# EAGLE board watts_meter (EAGLE 9.6.2)
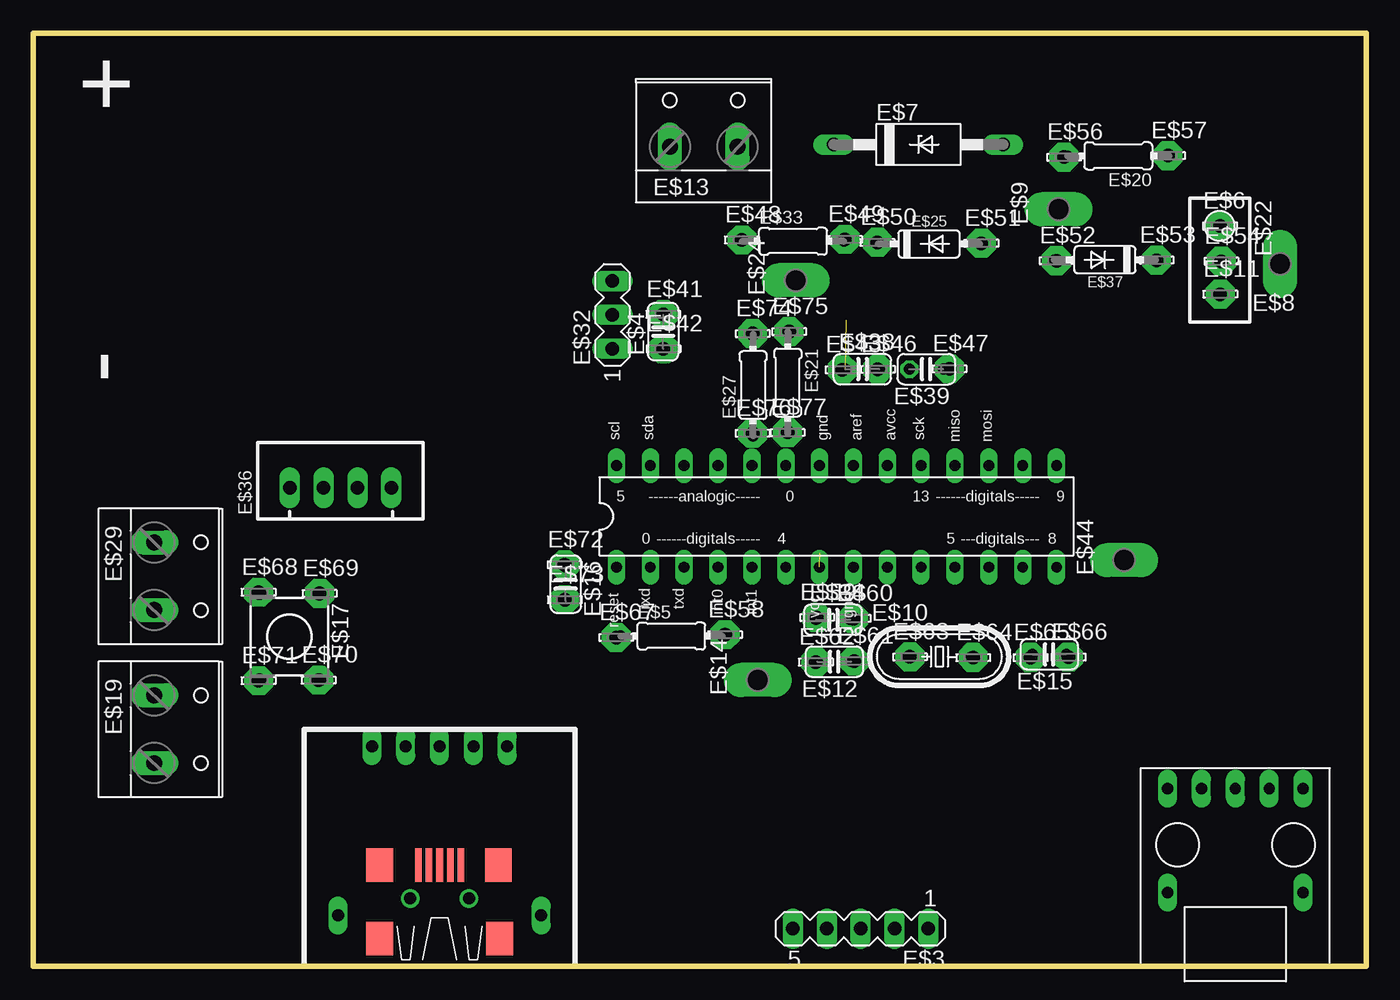
[diagram p0: board, top side]
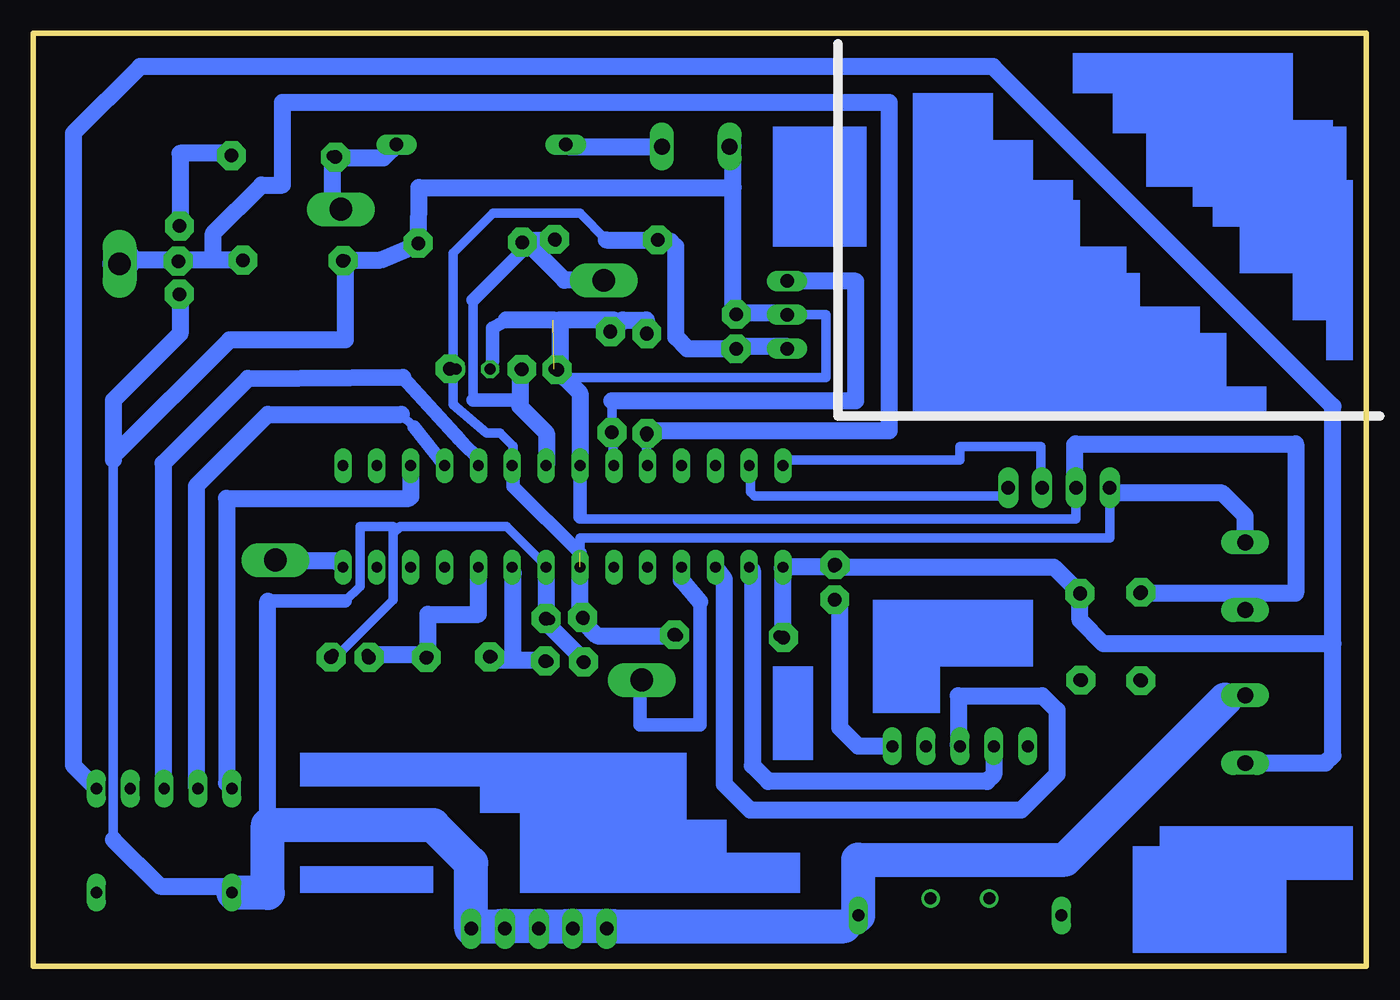
[diagram p1: board, bottom side, seen from below]

Size 100 x 70 mm. Coordinates in mm from the lower left corner, seen from the top.
Outline: 0,0 0,70 100,70 100,0 0,0
Copper layers (1*16): Top 0.035mm / dielectric 1.5mm / Bottom 0.035mm
Design rules "default *": minimum track width 0.7mm, minimum drill 24mil, track to track 8mil, track to pad 8mil, pad to pad 8mil, via to via 8mil, smd to smd 8mil, copper to edge 40mil, drill to drill 8mil, minimum pad ring 10mil, minimum via ring 8mil, stop-mask expansion 4mil, vias tented up to drill 0mil, thermal gap 10mil

## Footprints (pad centres in the part's own frame; a part is rotated, then mirrored left to right if it is on the bottom)
ATMEGA328 = drill 0.813 long: 1 -16.51,-3.81; 2 -13.97,-3.81; 3 -11.43,-3.81; 4 -8.89,-3.81; 5 -6.35,-3.81; 6 -3.81,-3.81; 7 -1.27,-3.81; 8 1.27,-3.81; 9 3.81,-3.81; 10 6.35,-3.81; 11 8.89,-3.81; 12 11.43,-3.81; 13 13.97,-3.81; 14 16.51,-3.81; 15 16.51,3.81; 16 13.97,3.81; 17 11.43,3.81; 18 8.89,3.81; 19 6.35,3.81; 20 3.81,3.81; 21 1.27,3.81; 22 -1.27,3.81; 23 -3.81,3.81; 24 -6.35,3.81; 25 -8.89,3.81; 26 -11.43,3.81; 27 -13.97,3.81; 28 -16.51,3.81
USBMINIB = smd 2.5 x 0.5: D+ -3.85,0; D- -3.85,0.8; GND -3.85,-1.6; ID -3.85,-0.8; VBUS -3.85,1.6 | drill 0.9 long: P$1 5.08,0; P$2 5.08,2.54; P$3 5.08,5.08; P$4 5.08,-2.54; P$5 5.08,-5.08; P$6 -7.62,7.62; P$7 -7.62,-7.62 | drill 0.9: P$8 -6.35,2.2; P$9 -6.35,-2.2 | smd 2.5 x 2: P$10 -9.35,-4.5; P$11 -9.35,4.5; P$12 -3.85,-4.4; P$13 -3.85,4.5
MA05-1 = drill 1.016 long: 1 -5.08,0; 2 -2.54,0; 3 0,0; 4 2.54,0; 5 5.08,0
C025-024X044 = drill 0.813 octagon: 1 -1.27,0; 2 1.27,0
0204/7 = drill 0.813 octagon: 1 -3.81,0; 2 3.81,0
LSP10 = drill 1.016 pad 2.159 octagon: MP 0,0
DIODE_F126Z12 = drill 1.016 long: A 6.35,0; C -6.35,0
P1-17Y = drill 1.702 pad 2.121 long: TP 0,0
HC49/S = drill 0.813: 1 -2.413,0; 2 2.413,0
W237-132 = drill 1.194 long: 1 -2.54,-0.635; 2 2.54,-0.635
TL1105 = drill 1 pad 1.676: 1 -2.25,3.25; 2 2.25,3.25; 3 -2.25,-3.25; 4 2.25,-3.25
RTRIM3296W = drill 0.61: 1 0,-2.54; 2 0,0; 3 0,2.54
DO35-7 = drill 0.813: A 3.81,0; C -3.81,0
MA03-1 = drill 1.016 long: 1 -2.54,0; 2 0,0; 3 2.54,0
JST-XH-04-PACKAGE-LONG-PAD = drill 1.016 long: 1 -3.81,0; 2 -1.27,0; 3 1.27,0; 4 3.81,0
USB-MICRO-PCB = drill 0.85 pad 1.422 long: P$1 -5.08,6.35; P$2 -2.54,6.35; P$3 0,6.35; P$4 2.54,6.35; P$5 5.08,6.35; P$6 -5.08,-1.47; P$7 5.08,-1.47

## Placement (x,y rotation side)
E$1  [ATMEGA328]  60.26,33.75 0 top
E$2  [USBMINIB]  30.48,11.43 90 top
E$3  ground-group  [MA05-1]  62.07,2.81 180 top
E$4  0.1uF  [C025-024X044]  47.26,47.61 90 top
E$5  10k  [0204/7]  47.87,24.77 0 top
E$6  [LSP10]  89.03,55.54 0 top
E$7  zener 60v  [DIODE_F126Z12]  66.4,61.65 0 top
E$8  123  [P1-17Y]  93.53,52.69 180 top
E$9  123  [P1-17Y]  76.93,56.8 90 top
E$10  16Mhz  [HC49/S]  67.97,23.23 0 top
E$11  [LSP10]  89.05,50.43 0 top
E$12  22p  [C025-024X044]  60.1,22.84 180 top
E$13  72V  [W237-132]  50.3,62.13 0 top
E$14  tx_to_multiplx  [P1-17Y]  54.35,21.47 90 top
E$15  22p  [C025-024X044]  76.22,23.41 180 top
E$16  [C025-024X044]  39.94,28.67 270 top
E$17  [TL1105]  19.22,24.73 180 top
E$19  reset  [W237-132]  9.71,17.78 270 top
E$20  2.2k  [0204/7]  81.4,60.8 180 top
E$21  10k  [0204/7]  56.6,43.8 270 top
E$22  2k - 202  [RTRIM3296W]  89,53 180 top
E$24  123  [P1-17Y]  57.19,51.47 90 top
E$25  5v1 zener  [DO35-7]  67.2,54.2 0 top
E$27  10k  [0204/7]  54,43.6 90 top
E$29  5V  [W237-132]  9.71,29.26 270 top
E$32  [MA03-1]  43.45,48.88 90 top
E$33  220  [0204/7]  57,54.4 0 top
E$34  1uF  [C025-024X044]  60,26 0 top
E$36  display  [JST-XH-04-PACKAGE-LONG-PAD]  23.04,35.91 0 top
E$37  5v1 zener  [DO35-7]  80.4,53 180 top
E$38  0.1uF  [C025-024X044]  62.2,44.8 0 top
E$39  1uF  [C025-024X044]  67,44.8 180 top
E$41  [LSP10]  47.26,48.91 0 top
E$42  [LSP10]  47.28,46.33 0 top
E$43  [LSP10]  60.7,44.76 0 top
E$44  tx_to_multiplx  [P1-17Y]  81.85,30.47 90 top
E$46  [LSP10]  63.36,44.79 0 top
E$47  [LSP10]  68.73,44.83 0 top
E$48  [LSP10]  53.16,54.51 0 top
E$49  [LSP10]  60.89,54.54 0 top
E$50  [LSP10]  63.32,54.32 0 top
E$51  [LSP10]  71.13,54.25 0 top
E$52  [LSP10]  76.77,52.94 0 top
E$53  [LSP10]  84.27,52.98 0 top
E$54  [LSP10]  89.13,52.9 0 top
E$56  [LSP10]  77.33,60.71 0 top
E$57  [LSP10]  85.13,60.82 0 top
E$58  [LSP10]  51.89,24.87 0 top
E$59  [LSP10]  58.79,26.17 0 top
E$60  [LSP10]  61.54,26.09 0 top
E$61  [LSP10]  61.59,22.9 0 top
E$62  [LSP10]  58.71,22.82 0 top
E$63  [LSP10]  65.76,23.21 0 top
E$64  [LSP10]  70.51,23.16 0 top
E$65  [LSP10]  74.81,23.16 0 top
E$66  [LSP10]  77.66,23.18 0 top
E$67  [LSP10]  43.73,24.66 0 top
E$68  [LSP10]  16.9,28.05 0 top
E$69  [LSP10]  21.47,27.96 0 top
E$70  [LSP10]  21.4,21.47 0 top
E$71  [LSP10]  16.9,21.42 0 top
E$72  [LSP10]  39.86,30.12 0 top
E$73  [LSP10]  39.88,27.5 0 top
E$74  [LSP10]  53.97,47.47 0 top
E$75  [LSP10]  56.7,47.62 0 top
E$76  [LSP10]  53.96,39.98 0 top
E$77  [LSP10]  56.58,40.05 0 top
PROGRAM  Program  [USB-MICRO-PCB]  90.19,6.99 0 top

## Library data of the parts
E$1 E$2 PROGRAM = LSGPackages
E$3 E$32 = con-lstb
E$4 E$12 E$15 E$16 E$22 E$34 E$38 E$39 = rcl
E$5 E$7 E$20 E$21 E$27 E$33 = eagle-ltspice
E$6 E$11 E$41-E$43 E$46-E$54 E$56-E$77 = solpad
E$8 = testpad; VOLTAGE_DIVIDER: voltage-div
E$9 = testpad; VOLTAGE_ZENER: voltage-zen60
E$10 = crystal
E$13 E$19 E$29 = con-wago-508
E$14 = testpad; INT0: int_in_attiny
E$17 = switch
E$24 = testpad; VOLTAGE_DIVIDER: aref
E$25 = diodes-zener; DIODEZENER: 4v7-zener
E$36 = Rembrandt Electronics - JST XH Connectors v1-0; A4: a4; A5: a5; GROUND: gnd; VCC: vcc
E$37 = diodes-zener; DIODEZENER: 5v1-zener
E$44 = testpad; TX_TO_MULTIPLX: tx_to_multiplx

## Nets
5V: E$1.7 E$1.20 E$4.1 E$5.2 E$29.1 E$32.1 E$33.1 E$34.1 E$36.1 E$39.1
GROUND: E$1.8 E$1.22 E$2.P$7 E$3.1 E$3.2 E$3.3 E$3.4 E$3.5 E$4.2 E$12.2 E$13.1 E$15.1 E$17.4 E$19.1 E$21.1 E$22.3 E$25.A E$27.2 E$29.2 E$32.2 E$34.2 E$36.2 E$37.A E$38.1 E$39.2 PROGRAM.P$6
S$2: E$1.9 E$10.1 E$12.1
S$3: E$1.10 E$10.2 E$15.2
S$4: E$1.13
S$5: E$2.P$5 E$16.2
S$7: E$1.1 E$5.1 E$16.1 E$17.3 E$19.2 PROGRAM.P$5
S$8: E$7.A E$9.TP E$20.2
S$9: E$7.C E$13.2
S$10: E$1.17 PROGRAM.P$1
S$11: E$1.18 PROGRAM.P$2
S$12: E$1.19 PROGRAM.P$3
S$13: E$1.3 E$2.P$1
S$14: E$1.2 E$2.P$2
S$15: E$1.28 E$36.3
S$16: E$1.27 E$36.4
S$17: E$20.1 E$22.1
S$19: E$1.14 E$44.TP
S$20: E$1.4 E$14.TP
S$21: E$1.23 E$21.2 E$32.3
S$23: E$1.24 E$8.TP E$22.2 E$27.1 E$37.C
S$24: E$1.21 E$24.TP E$25.C E$33.2 E$38.2

## Tracks (layer width: path | path; a pad name or v marks a point on that pad's centre or on a via)
5V  (1 unrouted)
  Bottom 0.7: 47,46.5 E$4.1 | 43.5,46.5 E$32.1 | 52.19,54.4 51.8,54.01 | 19,35.5 E$36.1 19.23,32.12 59,32.12 E$1.7 59,29.5 | 58.73,25.83 E$34.1 59,26 | 51.72,24.8 E$5.2 | 64,37.5 E$1.20 64,37.63 64.02,37.68 64.02,39.02 65,40 66,40 68.5,42.16 68.5,44.57 E$39.1 68.5,44.8 68.5,53.5 65.5,56.5 59,56.5 57,54.5 | 53.5,54.5 E$33.1
  Bottom 1.016: 64,37.5 64,36 59,31
  Bottom 1.27: 43.5,46.5 47,46.5 | 51.8,54.01 51.8,47.2 50.94,46.34 E$4.1 | 52.19,54.4 E$33.1 | 19,35.5 10.8,35.5 9.08,33.78 E$29.1 | 51.72,24.8 57.7,24.8 58.73,25.83 | 59,26 59,29.5 | 57,54.5 53.5,54.5
GROUND  (1 unrouted)
  Bottom 0.7: 61.27,25.53 E$34.2 61.5,26 | 59,23 E$12.2 | 61.5,29.5 E$1.8 61.5,30 64.5,33 72.5,33 73,32.5 | 73,32.5 73,33 75.5,33 75.5,28.5 76.6,27.4 | 73,32.5 73,27.5 77,23.5 E$15.1 | 60,3 E$3.4 | 62,3 E$3.3 62.5,3 | 64.5,3 E$3.2 | 85,5.5 PROGRAM.P$6 85.5,6 | 67,3 E$3.1 | 39.15,3 E$2.P$7 | 56.5,3 E$3.5 57,3 | 10.6,20 9.5,20 E$19.1 | 47,49 E$4.2 47.5,49 | 43.5,49 E$32.2 40.52,48.88 40.52,44.16 60.16,44.16 | 47.5,61.5 E$13.1 | E$39.2 65.54,45.4 | 59,38 E$1.22 | 58.99,33.69 58.84,33.55 21.77,33.55 E$36.2 21.86,35.94 | 21.86,39.14 21.8,39.2 | 94,38.5 94,38 94,9.5
  Bottom 1.016: 82.4,27.4 76.6,27.4 | 65.54,45.4 65.54,47.87 64.5,48.5 | E$1.22 58.99,33.69
  Bottom 1.27: 59,23 59,23.26 61.27,25.53 | 61.5,26 61.5,29.5 | 82.4,10.58 82.4,27.4 | 43.5,49 47,49 | 47.5,49 47.5,58.44 | 47.5,58.44 47.5,61.5 | 47.5,58.44 71.07,58.44 71.08,54.27 E$25.A 73.95,53 E$37.A 76.59,47 85.28,47 94,38.28 | 61,48.5 64.5,48.5 | E$27.2 54,48.5 55.79,48.5 E$21.1 56.6,48.4 56.5,48.5 60.5,48.5 60.5,45.23 E$38.1 60.5,44.5 60.16,44.16 59,43 59,38 | E$17.4 16.95,28 9.36,28 9.08,27.72 E$29.2 9.08,28 5.3,28 5.3,39.2 21.8,39.2 | 21.86,35.94 21.86,39.14 | 85.5,6 90.5,6 94,9.5 | 94,38.28 94,38 | 94,38.28 94,42.46 89,47.46 E$22.3
  Bottom 2.54: 62,3 60,3 | 62.5,3 64.5,3 | 85,5.5 82.4,5.5 82.4,10.58 70,10.58 67.15,7.73 E$3.1 | 67,3 65,3 E$3.2 | 56.5,3 39.15,3 | 10.6,20 22.6,8 38.1,8 E$2.P$7 | 57,3 59.5,3 E$3.4
S$2
  Bottom 0.7: 61.5,23 E$12.1 | 65.5,23 E$10.1 | 64,29.5 E$1.9
  Bottom 1.27: 65.5,23 64,23 | 64,23 61.5,23 | 64,23 64,29.5
S$3
  Bottom 0.7: 70.4,23.5 70.5,23.5 70.46,23.4 E$10.2
  Bottom 1.27: E$15.2 74.95,23.4 70.46,23.4 | 70.4,23.5 70.39,26.4 66.61,26.4 E$1.10
S$4
  Bottom 0.7: 74.24,29.92 E$1.13
S$5
  Bottom 1.27: E$2.P$5 38.11,16.51 39.5,17.9 39.5,27 E$16.2
S$7
  Bottom 0.7: 40,30 E$16.1 | 43.5,30 E$1.1 43.8,29.85 | 21.5,28 E$17.3
  Bottom 1.27: 43.5,30 40,30 | 43.8,29.85 43.8,25.04 E$5.1 | E$16.1 23.44,29.94 21.5,28 | PROGRAM.P$5 97,15.07 97,62.5 92,67.5 28,67.5 2.5,42 2.5,24.2 | 2.5,24.2 2.5,15.8 3.06,15.24 E$19.2 | E$17.3 21.47,25.97 19.7,24.2 2.5,24.2
S$8
  Bottom 1.27: E$7.A 73.75,60.65 77.44,60.65 E$20.2 77.59,57.46 E$9.TP
S$9
  Bottom 1.27: E$7.C 59.9,61.5 E$13.2
S$10
  Bottom 0.7: 71.82,35.11 71.69,35.23 | PROGRAM.P$1 85.5,13.73
  Bottom 1.27: E$1.17 71.69,35.23 | 71.82,35.11 85.5,35.11 85.5,13.73
S$11
  Bottom 0.7: 72.4,41.4 71.44,40.44 | PROGRAM.P$2 87.77,13.46
  Bottom 1.016: 71.44,40.44 E$1.18
  Bottom 1.27: 72.4,41.4 82.4,41.4 87.77,36.03 87.77,13.46
S$12
  Bottom 0.7: PROGRAM.P$3 90.27,13.42
  Bottom 1.016: 72.29,44.19 68,39.5 67.78,39.28 67.78,39.24 66.61,38.08 E$1.19
  Bottom 1.27: 72.29,44.19 83.9,44.1 90.27,37.73 90.27,13.42
S$13
  Bottom 0.7: E$2.P$1 30.6,16.63
  Bottom 1.27: 30.6,16.63 30.6,20.3 24.3,20.3 23.2,19.2 23.2,14.4 25.9,11.7 46.2,11.7 48.15,13.65 48.15,29.04 E$1.3
S$14
  Bottom 0.7: E$1.2 46.06,29.71
  Bottom 1.27: 46.06,29.71 46.06,15.06 44.86,13.86 28.44,13.86 27.94,14.36 E$2.P$2
S$15
  Bottom 0.7: E$36.3 24.4,36 24.4,39 30.5,39 30.5,38 43.75,38 E$1.28
S$16
  Bottom 0.7: E$1.27 46.2,37.54 46.2,35.6 45.9,35.3 26.87,35.3 26.85,35.35 E$36.4
S$17
  Bottom 0.7: 85.5,61 E$20.1
  Bottom 1.27: E$22.1 89,61 85.5,61
S$19
  Bottom 0.7: E$44.TP 81.84,30.44
  Bottom 1.27: 81.84,30.44 77.27,30.44 E$1.14
S$20
  Bottom 0.7: 51.37,28.98 E$1.4 | 54.5,21.32 E$14.TP
  Bottom 1.016: 50,27.35 50,18.1 54.5,18.1 54.5,21.32
  Bottom 1.27: 51.37,28.98 50,27.35
S$21
  Bottom 0.7: E$1.23 56.5,38 56.5,39.5 E$21.2 56.6,42.43 | 43.43,51.4 E$32.3
  Bottom 1.27: 43.43,51.4 38.3,51.4 38.3,42.43 | 38.3,42.43 56.6,42.43 38.3,42.43
S$23
  Bottom 0.7: E$27.1 54,38 E$1.24
  Bottom 1.27: E$37.C 86.5,53 | 86.5,53 E$22.2 93.22,53 | E$27.1 53.6,40.19 35.8,40.19 35.8,64.81 81.3,64.81 81.3,58.62 82.88,58.62 86.5,55 86.5,53
  Bottom 2.54: 93.22,53 E$8.TP
S$24
  Bottom 0.7: 61,54.5 E$33.2 | 63,54.5 E$25.C 63.5,54 63.5,53.5 | E$38.2 63.5,44.77 | 67,42.5 67,50
  Bottom 1.016: 67,50 63.5,53.5 | 63.5,42.5 67,42.5
  Bottom 1.27: 63,54.5 61,54.5 | 63.5,44.77 63.5,42.5 63.5,42 61.5,40 61.5,37.59 E$1.21 | E$24.TP 60.16,51.47 62.89,54.2 E$25.C
(copper drawn outside any net)
  shapes: Bottom area x37

## Text on the board
tPlace: + | -
tValues: debug | program
tTest: serial out